# Altium PCB PCB_ANALOG.PcbDoc (part 2 of 3)
Units mil, origin at the board's own origin, x right, y up, seen from the top; angles counter-clockwise.
Board outline 2560.08 x 1580 mil, 4 copper layers (Top Layer, Layer 2(GND), Layer 3(GND), Bottom Layer), stack 61.583 mil thick; 99 components, 80 nets, 399 pads, 88 vias.
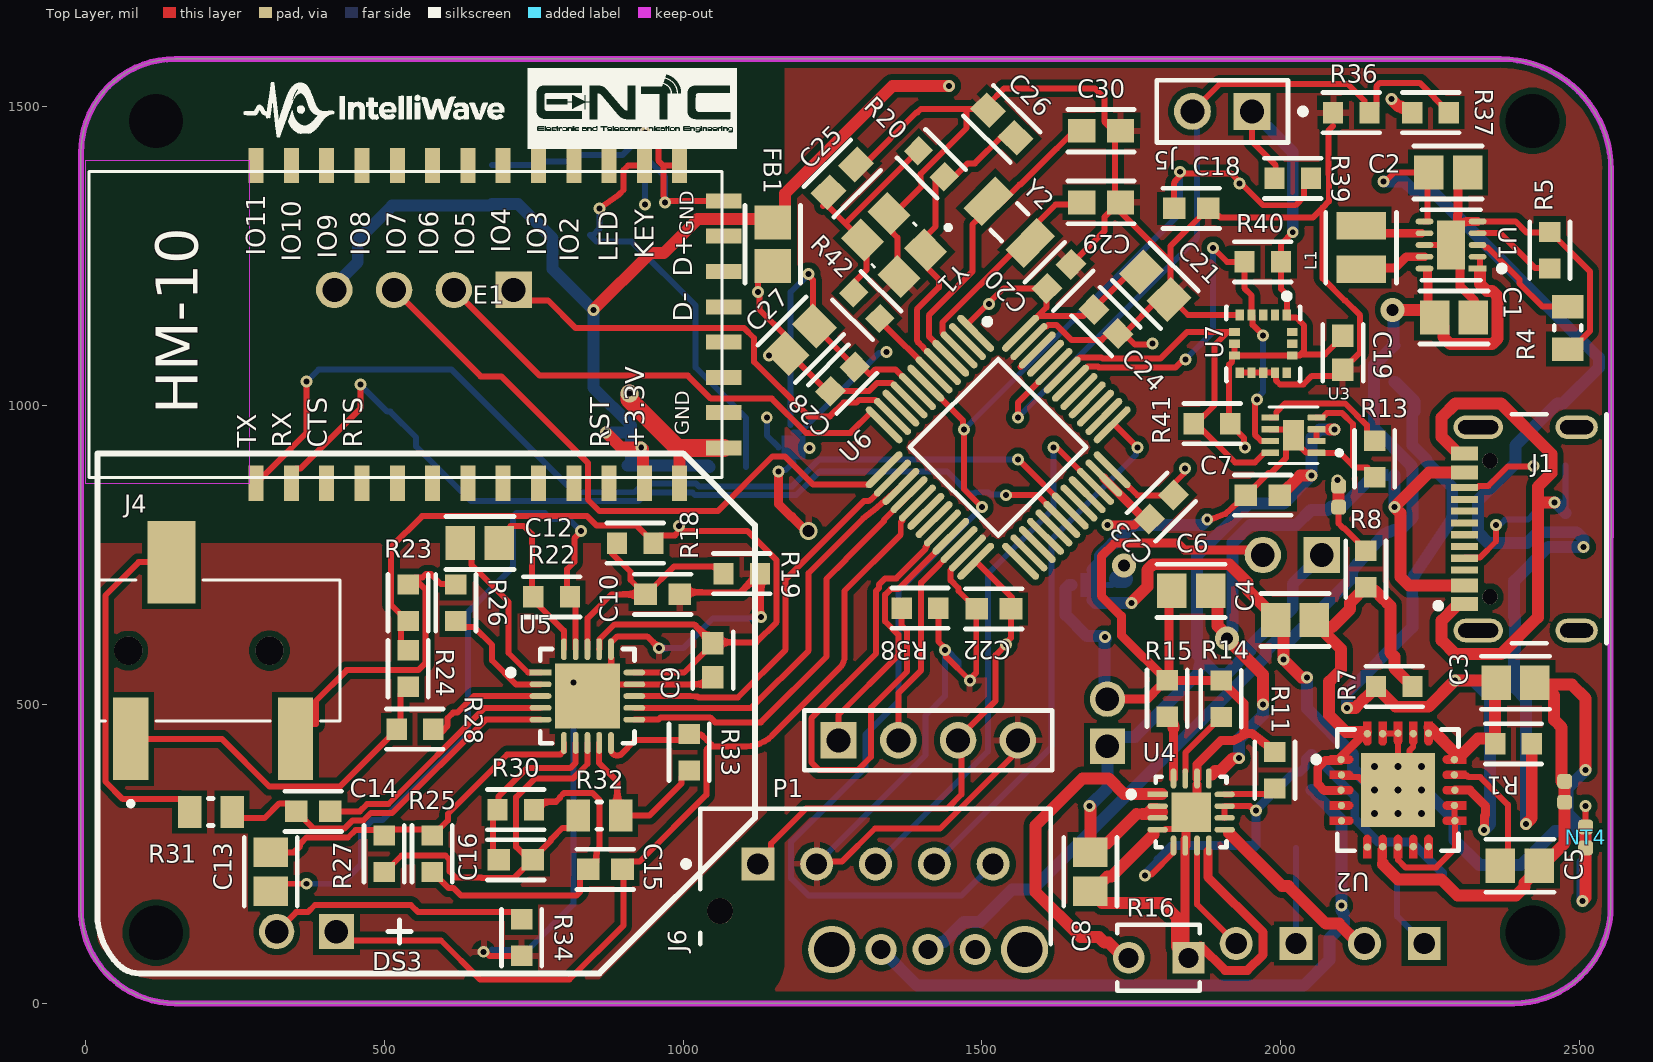
[diagram p0: Top Layer view]

## Part data (continued)
SW2: library part "Tactile Switch", "Tactile Switch, SPST-NO, 0.05 A, 12 V, -25 to 70 degC, 2-Pin SMD, RoHS, Tape and Reel", Case/Package=B3U-1000, Contact Current Rating=50mA, IP Rating=IP40, Manufacturer="Omron Electronic Components", Max Contact Resistance=100mohm, Max Operating Temperature=70°C, Max Voltage Rating (DC)=12V, Min Operating Temperature=-25°C, Operating Force=153gf, Package Description="2-Pin Surface Mount Device, Body 3 x 2.5 mm", Package Quantity=3500, Resistance=0.1Ohm, Contact Material=Silver, Current Rating=50mA, Datasheet URL=http://www.omron.com/ecb/products/pdf/en-b3u.pdf, Datasheet Version=Jan-15, Manufacturer URL=http://www.omron.com/, Max Current Rating=50mA, Mounting Technology=SM, Package Reference=B3U-1000, Packaging=TapeandReel, RoHS Compliant=True, Throw Configuration=SPST, Voltage Rating=12V, Voltage Rating (DC)=12V
U1: library part CMP-04918-000700-1, "1.8-V TO 5.5-V, 75-NA IQ BUCK-BO", RoHS Compliant=Yes
U2: library part CMP-04917-000027-1, "IC REG LINEAR POS ADJ 1A 20VQFN", Dropout Voltage=307mV, Manufacturer="Texas Instruments", Max Junction Temp=+125°C, Max Supply Voltage=35V, Min Supply Voltage=3V, Nominal Supply Current=0.58-6.1mA, Output Current=1A, Output Voltage=1.4-20.5V, Package=RGW0020A, Temperature="-40°C to +125°C", Temperature Range Low=-40°C, Accuracy Percentage=1%, Automotive=No, Category=IC, ComponentLink2Description=Datasheet, ComponentLink2URL=http://www.ti.com/lit/ds/symlink/tps7a47.pdf, Device Class L1="Integrated Circuits (ICs)", Device Class L2="Power Management ICs", Device Class L3="Voltage Regulators - Linear", Digikey Description="IC REG LINEAR POS ADJ 1A 20VQFN", Height=1mm, Lead Free=Yes, Manufacturer Part Number=TPS7A4700RGWR, Mouser Description="LDO Voltage Regulators Low Noise,1A,Hi Vltg LDO Reg", Number of Outputs=1, Octopart=https://octopart.com/tps7a4700rgwr-texas+instruments-21221956, Output Type=AdjustableProgrammable, RoHS=TRUE, Standoff Height=0mm, Temperature Range High=+125°C
U3: "3ÂµA 1-Cell/2-Cell Fuel Gauge with ModelGauge", Package="TDFN-8 Maxim", Availability="In Stock", Check_prices=https://www.snapeda.com/parts/MAX17048G+T10/Analog+Devices/view-part/?ref=eda, MF="Analog Devices", MP=MAX17048G+T10, Price=None, Purchase-URL=https://pricing.snapeda.com/search/part/MAX17048G+T10/?ref=eda, SnapEDA_Link=https://www.snapeda.com/parts/MAX17048G+T10/Analog+Devices/view-part/?ref=snap
U4: library part CMP-0321-00220-3, "IC LI-ION CHARGE MGMT 16-QFN", Battery Pack Voltage=4.2V, Case/Package=VQFN, Max Charge Current=1.5A, Max Operating Temperature=125°C, Max Supply Voltage=10.2V, Min Input Voltage=4.3V, Min Operating Temperature=-40°C, Min Supply Voltage=4.35V, Package Quantity=3000, Battery Chemistry=LITHIUM-ION, Contact Plating=Gold, Fault Protection="Over Voltage", Interface=USB, Lead Free="Lead Free", Number of Cells=1, Number of Pins=16, Output Current=1.5A, Output Voltage=4.2V, Packaging="Tape and Reel", Radiation Hardening=No, RoHS Compliant=Yes, Series=-, Weight=0.000808oz
U5: library part CMP-09085-000022-1, "IC ECG FRONT END 20LFCSP", Case/Package="LFCSP EP", Input Bias Current=200pA, Input Offset Voltage (Vos)=3mV, Max Operating Temperature=85°C, Max Supply Voltage=3.5V, Min Operating Temperature=-40°C, Min Supply Voltage=2V, Operating Supply Current=170uA, Power Supply Rejection Ratio (PSRR)=90dB, Common Mode Rejection Ratio=80dB, Contact Plating=Tin, Gain Bandwidth Product=100kHz, Height=0.75mm, Lead Free="Contains Lead", Length=4.1mm, Mount="Surface Mount", Number of Channels=1, Number of Pins=20, Packaging=Tray, Radiation Hardening=No, REACH SVHC="No SVHC", RoHS Compliant=Yes, Series=-, Slew Rate=0.2V/µs, Width=4.1mm
U6: "MCU 32-bit STM32F1 ARM Cortex M3 RISC 64KB Flash 2.5V/3.3V 48-Pin LQFP Tray", Case/Package=LFQFP, Clock Frequency=16MHz, Frequency=72MHz, I/Os (High Current)=37, Manufacturer=STMicroelectronics, Manufacturer Package Identifier=ai14911d, Max Operating Temperature=85°C, Max Power Dissipation=363mW, Max Supply Current=50mA, Max Supply Voltage=3.6V, Min Operating Temperature=-40°C, Min Supply Voltage=2V, Nominal Supply Current=1.7µA, Operating Frequency(F) (Processor speed) (MHz)=72, Operating Supply Voltage=3.3V, Supplier Part Number=497-6063-ND, Supply Voltage(Vcc) min (V)=2, Temperature Grade=Industrial, A/D Converter="2x12-bit (10 Channel)", ADC Channels (Resolution)="10-Ch 12-Bit", Address Bus Width=32b, Category=Microcontrollers, China RoHS=Compliant, ComponentLink1Description="Manufacturer URL", ComponentLink1URL=http://www.st.com/web/en/home.html, ComponentLink2Description=Datasheet, ComponentLink2URL=http://www.st.com/st-web-ui/static/active/en/resource/technical/document/datasheet/CD00161566.pdf, ComponentLink3Description="Package Specification", ComponentLink3URL=http://www.st.com/st-web-ui/static/active/en/resource/technical/document/datasheet/DM00058181.pdf, ComponentLink4Description=https://datasheet.octopart.com:443/STM32F103C8T6-STMicroelectronics-datasheet-177520228.pdf?src-supplier=IHS, ComponentLink4URL=https://datasheet.octopart.com:443/STM32F103C8T6-STMicroelectronics-datasheet-177520228.pdf?src-supplier=IHS, ComponentLink5Description=https://datasheet.octopart.com:443/STM32F103C8T6-STMicroelectronics-datasheet-10330614.pdf?src-supplier=Newark, ComponentLink5URL=https://datasheet.octopart.com:443/STM32F103C8T6-STMicroelectronics-datasheet-10330614.pdf?src-supplier=Newark, ComponentLink6Description=https://datasheet.octopart.com:443/STM32F103C8T6-STMicroelectronics-datasheet-16839800.pdf?src-supplier=Newark, ComponentLink6URL=https://datasheet.octopart.com:443/STM32F103C8T6-STMicroelectronics-datasheet-16839800.pdf?src-supplier=Newark, ComponentLink7Description=https://datasheet.octopart.com:443/STM32F103C8T6-STMicroelectronics-datasheet-48026265.pdf?src-supplier=ICpick, ComponentLink7URL=https://datasheet.octopart.com:443/STM32F103C8T6-STMicroelectronics-datasheet-48026265.pdf?src-supplier=ICpick, ComponentLink8Description=https://datasheet.octopart.com:443/STM32F103C8T6-STMicroelectronics-datasheet-14363502.pdf?src-supplier=Farnell, ComponentLink8URL=https://datasheet.octopart.com:443/STM32F103C8T6-STMicroelectronics-datasheet-14363502.pdf?src-supplier=Farnell, ComponentLink9Description=https://datasheet.octopart.com:443/STM32F103C8T6-STMicroelectronics-datasheet-500013.pdf?src-supplier=Farnell, ComponentLink9URL=https://datasheet.octopart.com:443/STM32F103C8T6-STMicroelectronics-datasheet-500013.pdf?src-supplier=Farnell, ComponentLink10Description=https://datasheet.octopart.com:443/STM32F103C8T6-STMicroelectronics-datasheet-8365036.pdf?src-supplier=Farnell, ComponentLink10URL=https://datasheet.octopart.com:443/STM32F103C8T6-STMicroelectronics-datasheet-8365036.pdf?src-supplier=Farnell, ComponentLink11Description=https://datasheet.octopart.com:443/STM32F103C8T6-STMicroelectronics-datasheet-6396519.pdf?src-supplier=Verical, ComponentLink11URL=https://datasheet.octopart.com:443/STM32F103C8T6-STMicroelectronics-datasheet-6396519.pdf?src-supplier=Verical, ComponentLink12Description=https://datasheet.octopart.com:443/STM32F103C8T6-STMicroelectronics-datasheet-21407612.pdf?src-supplier=element14+APAC, ComponentLink12URL=https://datasheet.octopart.com:443/STM32F103C8T6-STMicroelectronics-datasheet-21407612.pdf?src-supplier=element14+APAC, ComponentLink13Description=https://datasheet.octopart.com:443/STM32F103C8T6-STMicroelectronics-datasheet-8700640.pdf?src-supplier=element14, ComponentLink13URL=https://datasheet.octopart.com:443/STM32F103C8T6-STMicroelectronics-datasheet-8700640.pdf?src-supplier=element14, ComponentLink14Description=https://datasheet.octopart.com:443/STM32F103C8T6-STMicroelectronics-datasheet-165583531.pdf?src-supplier=SOS+electronic, ComponentLink14URL=https://datasheet.octopart.com:443/STM32F103C8T6-STMicroelectronics-datasheet-165583531.pdf?src-supplier=SOS+electronic, ComponentLink15Description=https://datasheet.octopart.com:443/STM32F103C8T6-STMicroelectronics-datasheet-14106722.pdf?src-supplier=iiiC, ComponentLink15URL=https://datasheet.octopart.com:443/STM32F103C8T6-STMicroelectronics-datasheet-14106722.pdf?src-supplier=iiiC, ComponentLink16Description=https://datasheet.octopart.com:443/STM32F103C8T6-STMicroelectronics-datasheet-17594274.pdf?src-supplier=TME, ComponentLink16URL=https://datasheet.octopart.com:443/STM32F103C8T6-STMicroelectronics-datasheet-17594274.pdf?src-supplier=TME, ComponentLink17Description=https://datasheet.octopart.com:443/STM32F103C8T6-STMicroelectronics-datasheet-148251.pdf?src-supplier=Nu+Horizons, ComponentLink17URL=https://datasheet.octopart.com:443/STM32F103C8T6-STMicroelectronics-datasheet-148251.pdf?src-supplier=Nu+Horizons, Core="ARM Cortex-M3", Core Architecture=ARM, Country of Origin=Malaysia, Data Bus Width=32b, DatasheetVersion="Rev. 16", Density=512kb, EEPROM Memory Size=0B, Export Control Classification Number (ECCN) Code=3A991.A.2, Flash Memory Size=64kB, FLASH Size (Prog) (kB)=64, Harmonized Tariff Schedule (HTS) Code=8542.31.00.25, Height=1.45mm, Height - Seated (Max)=1.6mm, Interface="CAN, USB", Internal RAM Size (kB)=20, Introduction Date=2007-06-07, Lead Free="Lead Free", Length=7mm, Lifecycle Status=Production, Manufacturer Part Number=STM32F103C8T6, Memory Format=FLASH, Memory Size=64kB, Mounting Technology="Surface Mount", Number of A/D Converters=2, Number of ADC Channels=10, Number of Bits=32, Number of Channels=10, Number of I2C Channels=2, Number of I/Os=37, Number of Interrupts=16, Number of Programmable I/O=48, Number of PWM Channels=1, Number of SPI Channels=2, Number of Terminals=48, Number of Timers/Counters=4, Number of USART Channels=3, Oscillator Type=Internal, PackageDescription="48-Pin Low Profile Quad Flat Package, 7 x 7 mm Body, 0.5 mm Pitch", PackageReference=LQFP48, PackageVersion="Rev. 6, 06/2013", Packing=Tray, PartNumber=STM32F103C8T6, Peripherals=POR, Pins=48, Pricing="1=6.15, 10=4.713, 25=4.3536, 100=3.9587, 250=3.77048, 500=3.657, 1000=3.5636, 2500=3.46503 (USD)", Radiation Hardening=No, RAM Size=20kB, REACH SVHC=Yes, RoHS=Compliant, Schedule B=8542310000, Stock=1445, Supplier=DigiKey, Terminal Pitch=500µm, Termination=SMD/SMT, Watchdog Timer=Yes, Width=7mm
U7: library part CMP-0234-00055-6, "ACCEL 2-16G I2C/SPI 16LGA", Case/Package=LGA, Max Operating Temperature=85°C, Max Supply Voltage=3.6V, Min Operating Temperature=-40°C, Min Supply Voltage=1.71V, Operating Supply Current=11uA, Operating Supply Voltage=2.5V, Package Quantity=1, Axis="X, Y, Z", Bandwidth=5kHz, Contact Plating=Gold, Depth=3mm, Height=1mm, Interface=I2C, Lead Free="Lead Free", Length=3mm, Max Supply Voltage (DC)=3.6V, Min Supply Voltage (DC)=1.71V, Number of Pins=16, Output Type=Digital, Packaging="Tape and Reel", Radiation Hardening=No, REACH SVHC="No SVHC", Resolution=16b, RoHS Compliant=Yes, Sensor Type="3 Axis", Series=-, Width=3mm
Y1: "Crystal, Aec-Q200, 8Mhz, 3.2Mm X 2.5Mm Rohs Compliant: Yes", Frequency=8MHz, Frequency Stability=50ppm, Frequency Tolerance=0.001%, Load Capacitance=18pF, Manufacturer=Abracon, Manufacturer Part Number=ABM8AIG-8.000MHZ-1Z-T, Max Operating Temperature=125°C, Min Operating Temperature=-40°C, Package="NON STANDARD Abracon", Supplier Part Number=535-15256-6-ND, Category=Crystals, Check_prices=https://www.snapeda.com/parts/ABM8AIG-8.000MHZ-1Z-T/Abracon/view-part/?ref=eda, China RoHS=Compliant, ComponentLink1Description=https://datasheet.octopart.com:443/ABM8AIG-8.000MHZ-1Z-T-Abracon-datasheet-154833173.pdf?src-supplier=Master+Electronics, ComponentLink1URL=https://datasheet.octopart.com:443/ABM8AIG-8.000MHZ-1Z-T-Abracon-datasheet-154833173.pdf?src-supplier=Master+Electronics, ComponentLink2Description=https://datasheet.octopart.com:443/ABM8AIG-8.000MHZ-1Z-T-Abracon-datasheet-78375026.pdf?src-supplier=JRH+Electronics, ComponentLink2URL=https://datasheet.octopart.com:443/ABM8AIG-8.000MHZ-1Z-T-Abracon-datasheet-78375026.pdf?src-supplier=JRH+Electronics, ComponentLink3Description=http://sigma.octopart.com:80/conflict_mineral_statement/Abracon-company-27.pdf?src-supplier=Compliance+Statements, ComponentLink3URL=http://sigma.octopart.com:80/conflict_mineral_statement/Abracon-company-27.pdf?src-supplier=Compliance+Statements, Country of Origin=Taiwan, ESR=500Ω, Introduction Date=2019-06-13, Lifecycle Status=Production, MF="Abracon LLC", Mounting Technology="Surface Mount", MP=ABM8AIG-8.000MHZ-1Z-T, Pricing="1=1.1, 10=0.959, 25=0.9064, 50=0.869, 100=0.833, 250=0.78776, 500=0.75518 (USD)", REACH SVHC=Yes, RoHS=Compliant, SnapEDA_Link=https://www.snapeda.com/parts/ABM8AIG-8.000MHZ-1Z-T/Abracon/view-part/?ref=snap, Supplier=DigiKey
Y2: library part CMP-2000-05735-3, "Crystal 32.768kHz ±20ppm (Tol) 6pF FUND 70kΩ 2-Pin CSMD T/R", Case/Package=CSMD, ESR (Equivalent Series Resistance)=70kR, Frequency=32.768kHz, Frequency Tolerance=20ppm, Load Capacitance=6pF, Max Operating Temperature=85°C, Min Operating Temperature=-40°C, Operating Frequency="32.768 kHz", Package Quantity=3000, Depth=1.5mm, Height=0.9mm, Lead Free="Lead Free", Length=3.2mm, Mount="Surface Mount", Number of Pins=2, Packaging="Tape and Reel", Radiation Hardening=No, REACH SVHC="No SVHC", RoHS Compliant=Yes, Series=ABS07, Series Resistance=70kR, Termination=SMD/SMT, Tolerance=20ppm, Width=1.5mm

## Free pads (board coordinates)
  round 0 hole 90.55: 2(118.11,118.11) 2(118.11,1476.38) 2(2421.26,118.11) 2(2421.26,1476.38)

## Via types
v1: diameter 20, hole 10, Top Layer to Bottom Layer, 74 vias
v2: diameter 23.62, hole 11.81, Top Layer to Bottom Layer, 9 vias
v3: diameter 40, hole 20, Top Layer to Bottom Layer, 3 vias
v4: diameter 30/30/30/30 (per signal layer), hole 10, Top Layer to Bottom Layer, tented bottom, 1 vias
v5: diameter 30, hole 20, Top Layer to Bottom Layer, 1 vias

## Nets (pads, with @x,y where several pads share a name; then routed paths per layer and width w, separated by ;. In a path a pad name is that pad's centre, name@x,y a point inside that pad or via, vN(x,y) a via of type N, cw(c..) or ccw(c..) an arc to the next point about the centre after c; other vN are vias at no path point)
3V3: NT5.1 R8.2 | length 93.3
  Top Layer w10: NT5.1@2096.75,830.11 2096.75,802.61 2103.85,795.51 2105.15,795.51 2129.39,771.27 2129.39,768.97 2141.29,757.06 R8.2@2142.35,757.06
5V: C6.2 NT1.2 U4.13 | length 839.7
  Top Layer w20: C6.2@1882.51,690 1882.51,685 1896.17,671.33 1894.08,671.33 1894.08,631.33 1910,615.41 v3(1910,610) 1970,550 v1(1970,500) ; 1884.82,383.07 1890.11,388.36 1898.36,388.36 1920,410 v1(1930,410)
  Bottom Layer w20: v3(1910,610) 1910,615.41 1919.49,624.9 1919.49,770.92 1949.08,800.51 2025.75,800.51 2050.47,825.24 2078.39,825.24 2084.73,831.58 2103.67,831.58 NT1.2@2155.59,883.5 ; v1(1930,410) 1930,442.16 1970,482.16 v1(1970,500)
AGND: C9.1 C10.1 C27.1 C28.1 NT6.3 R19.1 R34.1 U5.14 U5.16 U5.21 U6.8 | length 2697.9
  Top Layer w10: v1(666.32,86.2) 669.03,86.2 675.81,79.42 R34.1@730,79.42 ; U5.16@879.37,592.39 879.37,605.43 879.66,605.72 881.7,605.72 890,614.03 940,614.03 v1(960,594.03) ; U5.16@879.66,579.07 879.66,553.69 859.68,533.71 U5.14@918.37,533.71 1038.3,533.71 C9.1@1050,545.42 ; C10.1@994.31,684.03 997.81,687.53 1096.59,687.53 1112.5,703.44 1114.49,703.44 1128.8,717.75 R19.1@1128.8,718.8 1130,717.6 v1(1130,646.43) ; v1(1210,1220) 1210,1217.29 1217.15,1210.14 1217.15,1135.74 C27.1@1219.96,1132.93 1219.96,1132.48 C28.1@1287.61,1064.83 ; C28.1@1287.15,1064.37 1300.09,1064.37 1312.78,1051.68 1321.76,1060.65 1354.97,1060.65 U6.8@1392.12,1023.5
  Layer 3(GND) w30: v1(1130,646.43) 1130,790 1340,1000 v1(1340,1090)
  Bottom Layer w10: 680,90 680.92,89.08 740,89.08 816.32,165.4 v1(816.32,536.78) ; v1(960,594.03) 1000,594.03 1050,644.03 1120.52,644.03 1121.02,644.52 1128.09,644.52 v1(1130,646.43) ; NT6.3@1180,967.23 1180,1190 v1(1210,1220) ; NT6.3@1185,955 1195,955 1328.09,1088.09 1338.09,1088.09 v1(1340,1090)
AVDD: C9.2 C27.2 C28.2 FB1.2 R18.2 R23.2 R24.2 U5.15 U5.17 U6.9 | length 1987
  Top Layer w10: R23.2@539.64,639.42 527.73,627.52 527.73,602.48 539.64,590.58 R24.2@540,590.58 ; R23.2@540,639.42 538.95,639.42 511.14,667.23 511.14,762.84 563.3,815 839.48,815 855.51,798.98 922.65,798.98 R18.2@950.58,771.05 ; U5.17@859.69,592.39 859.97,592.68 859.97,608.7 885.3,634.03 1018.61,634.03 1036.13,616.51 1037.04,616.51 1050,603.55 C9.2@1050,602.64 ; U5.15@918.37,553.4 1001.68,553.4 1050,601.72 C9.2@1050,602.64 ; R18.2@950.58,770 R18.2@950.58,771.05 ; v1(993.34,798.35) v1@993.34,790 ; v1(1125,1190) 1125,1209.92 1148.64,1233.56 FB1.2@1150,1233.56 ; v1@1127.92,1190 1127.92,1160.43 1173.98,1114.36 C27.2@1173.98,1086.95 ; v1(1143.66,1083.66) 1146.95,1086.95 C27.2@1173.98,1086.95 ; U6.9@1378.2,1009.58 1377.71,1009.58 1349.76,1037.53 1324.2,1037.53 1311.36,1024.69 1288.57,1024.69 1288.45,1024.56 1247.34,1024.56 C28.2@1246.69,1023.91 ; R18.2@950.58,771.05 962.48,782.96 986.3,782.96 v1@993.34,790 ; v1@993.34,790 1107.88,790 1156.61,741.27 1156.61,637.69 1122.66,603.73 1051.1,603.73 C9.2@1050,602.64 ; C27.2@1173.98,1086.95 1178.27,1086.95 C28.2@1241.31,1023.91 ; C28.2@1241.31,1023.91 C28.2@1246.69,1023.91 ; C28.2@1241.31,1023.91 C28.2@1246.69,1023.91